# Altium PCB ProbeAmp.PcbDoc (part 1 of 2)
Units mm, origin at the board's own origin, x right, y up, seen from the top; angles counter-clockwise.
Board outline 75 x 25 mm, 6 copper layers (L1, L2, L3, L4, L5, L6), stack 1.04 mm thick; 123 components, 72 nets, 387 pads, 161 vias.
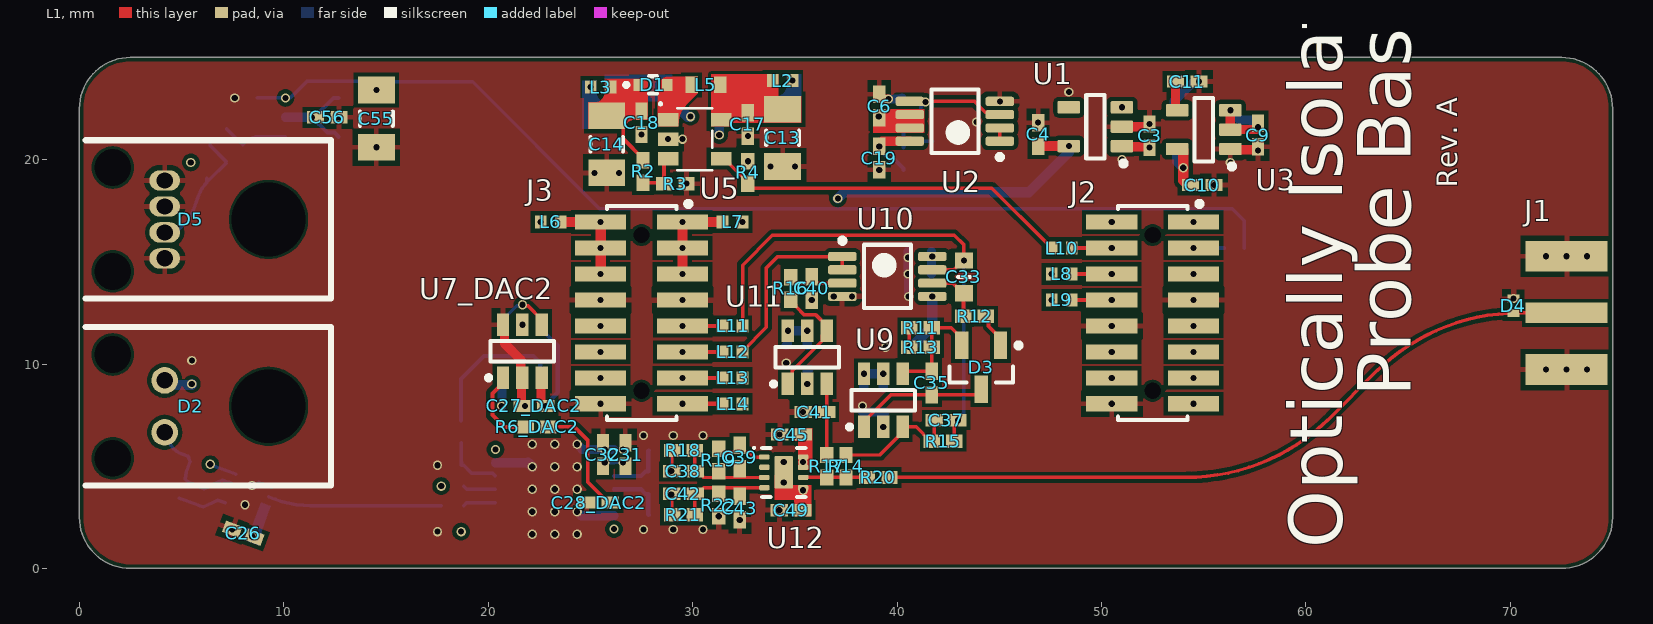
[diagram p0: L1 view]
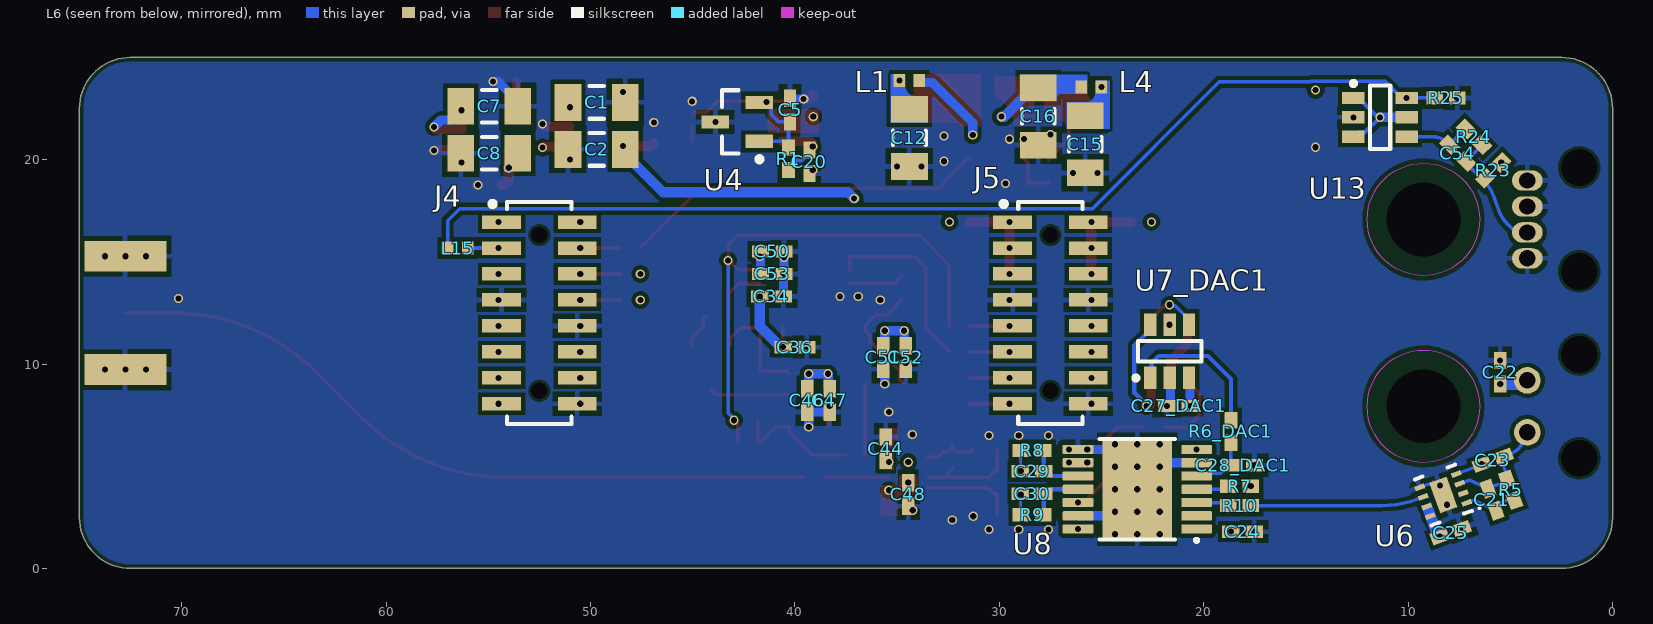
[diagram p1: L6 view, seen from below]
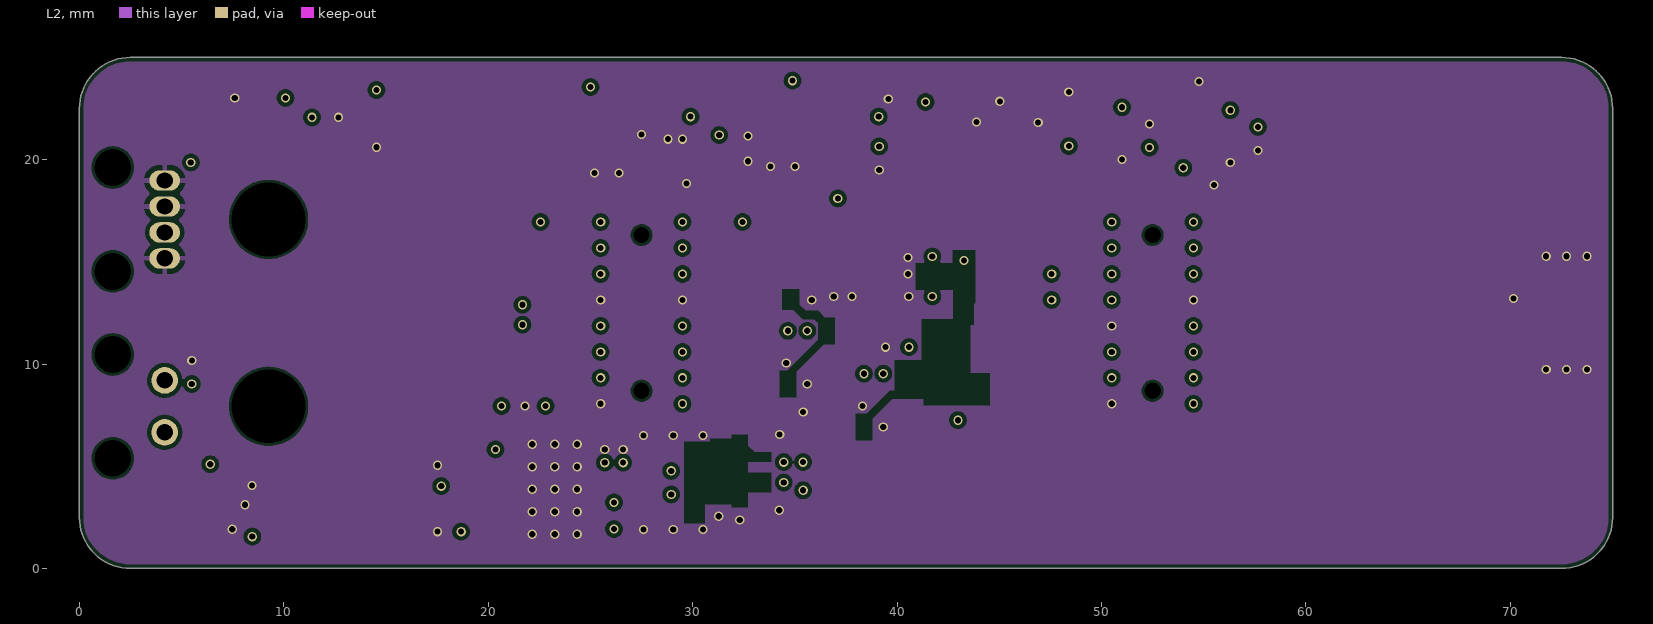
[diagram p2: L2]
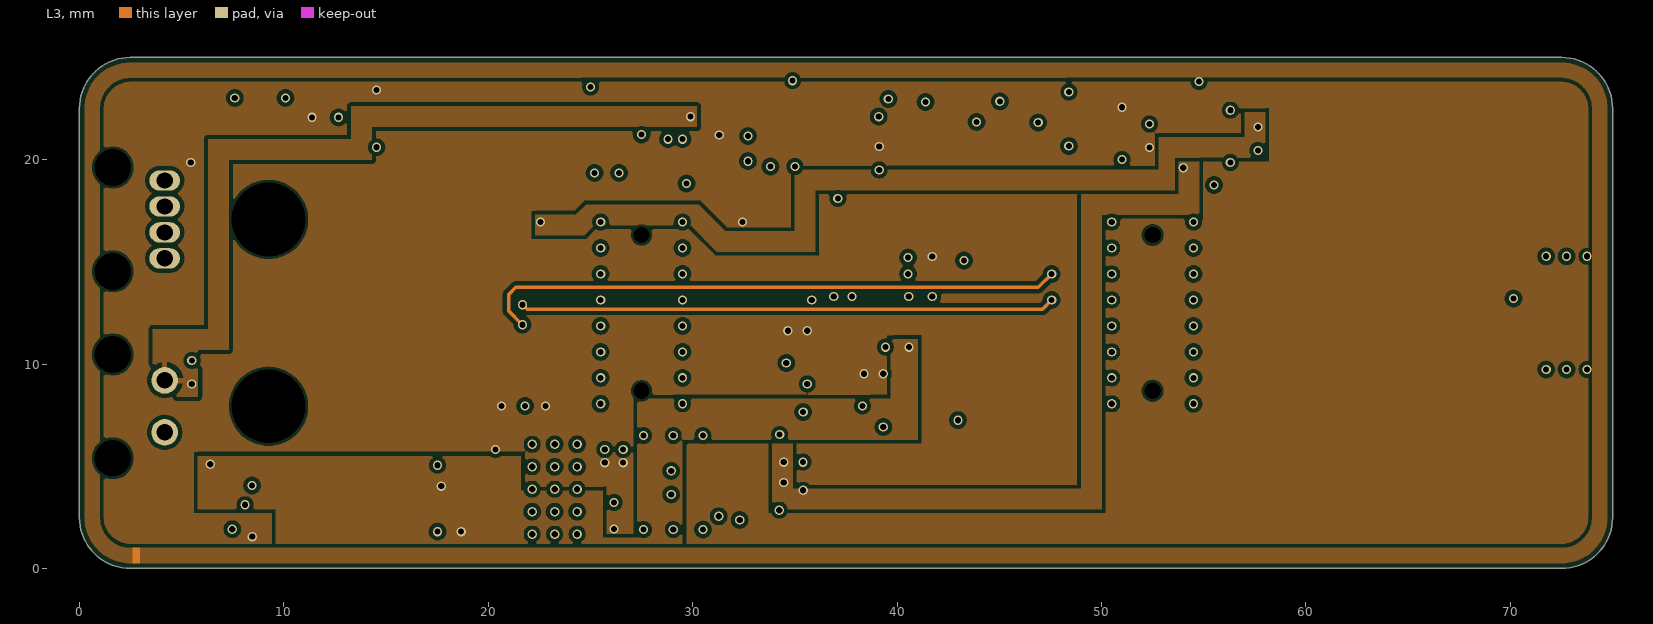
[diagram p3: L3]
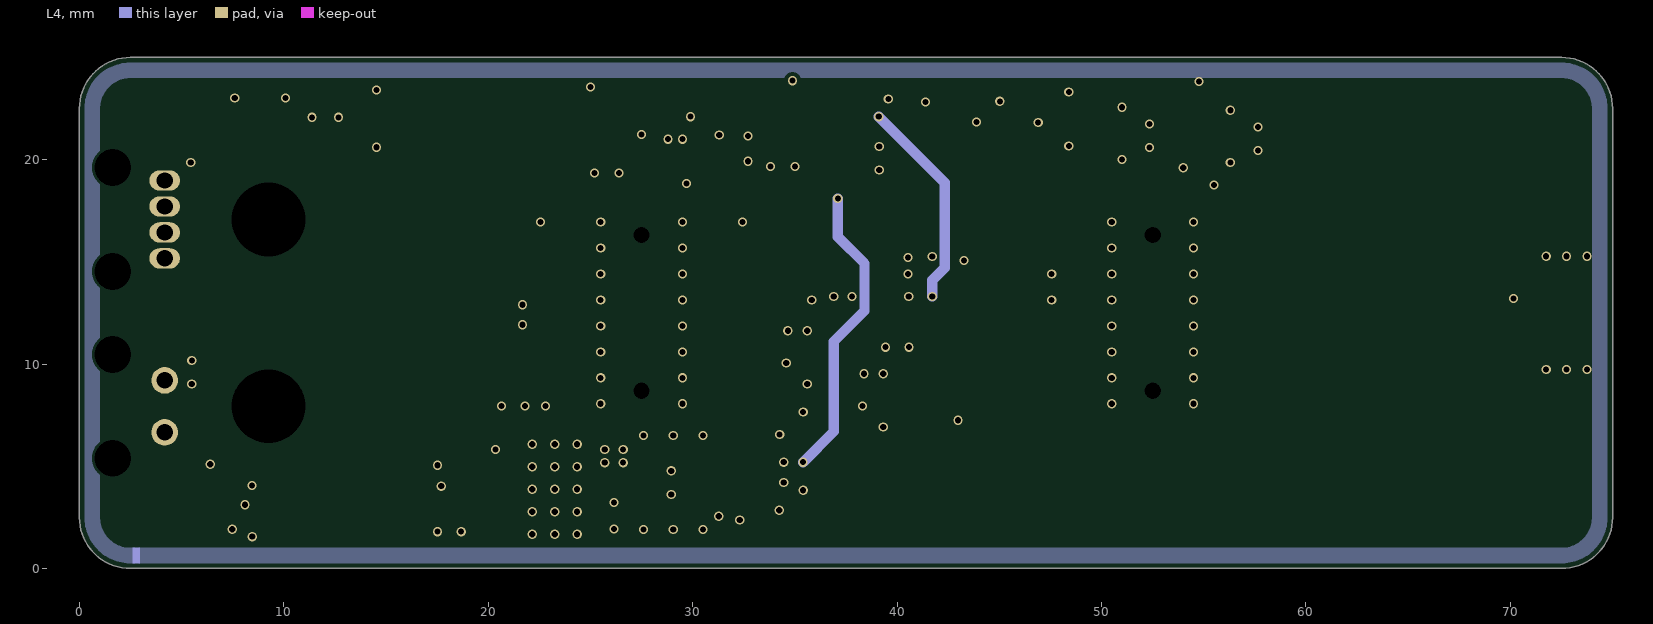
[diagram p4: L4]
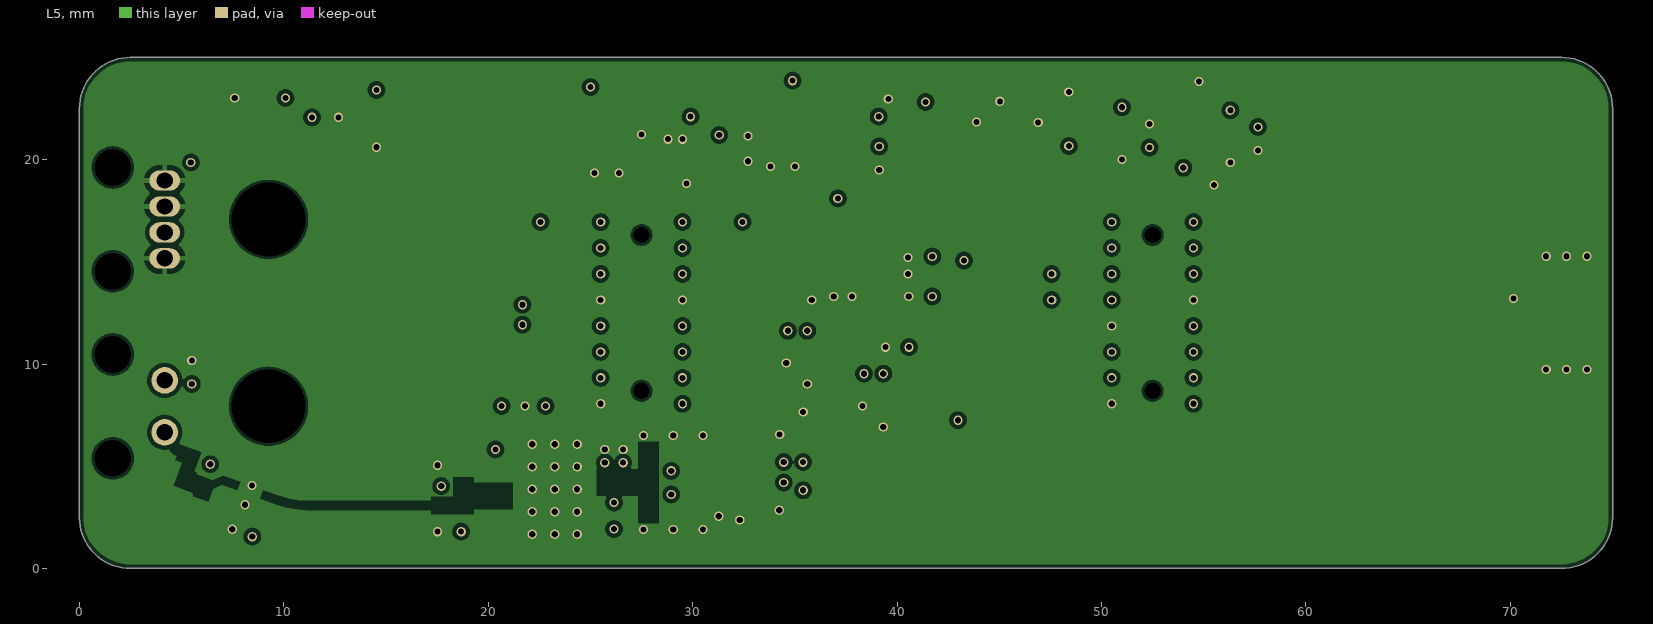
[diagram p5: L5]

## Layer stack, top to bottom
Top Solder: solder mask 0.0102, Solder Resist, Dk 3.5
L1: signal copper 0.035
Dielectric 2: prepreg 0.0994, PP-006, Dk 4.1
L2: signal copper 0.0152
Dielectric 4: core 0.25, PP-006, Dk 4.1
L3: signal copper 0.0152
Dielectric 1: prepreg 0.2104, FR-4, Dk 4.8
L4: signal copper 0.0152
Dielectric 5: core 0.25, PP-006, Dk 4.1
L5: signal copper 0.0152
Dielectric 3: prepreg 0.0994, PP-006, Dk 4.1
L6: signal copper 0.035
Bottom Solder: solder mask 0.0102, Solder Resist, Dk 3.5

## Board outline
0,2.5 ccw(c2.5,2.5) 2.5,0 72.5,0 ccw(c72.5,2.5) 75,2.5 75,22.5 ccw(c72.5,22.5) 72.5,25 2.5,25 ccw(c2.5,22.5) 0,22.5

## Design rules (kind name [scope] priority, off if disabled: settings)
BoardOutlineClearance BoardOutlineClearance_Exceptions [HasFootprint('GCT_USB4110-GF-A') Or HasFootprint('INDUSTRIALFIBEROPTICS_IF-E99B')] p1: gap=0 ignorepadtopadclearanceinfootprint=FALSE
BoardOutlineClearance [All] p2: gap=0.2 ignorepadtopadclearanceinfootprint=FALSE
Clearance Clearance_MOLEX_2171800001 [HasFootprint('MOLEX_2171800001') vs HasFootprint('MOLEX_2171800001')] p1: gap=0.13 ignorepadtopadclearanceinfootprint=FALSE except(0.07: Arc-Hole Track-Hole SMDPad-Hole THPad-Hole Via-Hole Fill-Hole Poly-Hole Region-Hole Text-Hole; 0.2: Arc-Fill Arc-Poly Track-Fill Track-Poly SMDPad-Fill SMDPad-Poly THPad-Fill THPad-Poly Via-Fill Via-Poly Fill-Fill Fill-Poly Poly-Poly)
Clearance [All] p2: gap=0.13 ignorepadtopadclearanceinfootprint=FALSE except(0.2: Arc-Fill Arc-Poly Track-Fill Track-Poly SMDPad-Fill SMDPad-Poly THPad-Fill THPad-Poly Via-Fill Via-Poly Fill-Fill Fill-Poly Poly-Poly)
ComponentClearance [All] p1: gap=0 collisioncheckmode=3 verticalgap=0.254 showdistances=FALSE
DiffPairsRouting DiffPairsRouting_D100 [InDifferentialPairClass('D100')] p1: maxlimit=0.254 minlimit=0.127 mostfreqgap=0.254 toplayer_maxgap=0.127 toplayer_prefgap=0.127 toplayer_minwidth=0.115 toplayer_maxwidth=0.115 toplayer_prefwidth=0.115 bottomlayer_maxgap=0.127 bottomlayer_prefgap=0.127 bottomlayer_minwidth=0.115 bottomlayer_maxwidth=0.115 bottomlayer_prefwidth=0.115 impedanceprofiledriven=TRUE impedanceprofileid={8845BCCA-81C3-408D-A366-10A4A17C61EE} impedanceprofilevalue=100.000000 maxuncoupledlength=12.7
DiffPairsRouting [All] p2: maxlimit=0.254 minlimit=0.254 mostfreqgap=0.254 toplayer_minwidth=0.381 toplayer_maxwidth=0.381 toplayer_prefwidth=0.381 midlayer1_minwidth=0.381 midlayer1_maxwidth=0.381 midlayer1_prefwidth=0.381 midlayer2_minwidth=0.381 midlayer2_maxwidth=0.381 midlayer2_prefwidth=0.381 midlayer3_minwidth=0.381 midlayer3_maxwidth=0.381 midlayer3_prefwidth=0.381 midlayer4_minwidth=0.381 midlayer4_maxwidth=0.381 midlayer4_prefwidth=0.381 bottomlayer_minwidth=0.381 bottomlayer_maxwidth=0.381 bottomlayer_prefwidth=0.381 maxuncoupledlength=12.7
HoleSize [All] p1: absolutevalues=TRUE maxlimit=6 minlimit=0.3 maxpercent=80.000 minpercent=20.000
MinimumAnnularRing [All] p1: minimumring=0.075
MinimumSolderMaskSliver [All] p1: minsoldermaskwidth=0.1
PolygonConnect [All] p1: thpad.connectstyle=Relief thpad.reliefconductorwidth=0.254 thpad.reliefentries=4 thpad.polygonreliefangle="90 Angle" thpad.airgapwidth=0.254 smdpad.connectstyle=Relief smdpad.reliefconductorwidth=0.254 smdpad.reliefentries=4 smdpad.polygonreliefangle="90 Angle" smdpad.airgapwidth=0.254 via.connectstyle=Direct via.reliefconductorwidth=0.254 via.reliefentries=4 via.polygonreliefangle="90 Angle" via.airgapwidth=0.254
RoutingVias [All] p1: holewidth=0.3 width=0.45 viastyle="Through Hole" minholewidth=0.3 minwidth=0.45 maxholewidth=0.5 maxwidth=1
SilkToSilkClearance [All] p1: silktosilkclearance=0
SilkToSolderMaskClearance [IsPad] p1: minsilkscreentomaskgap=0.001 clearancetoexposedcopper=TRUE
SolderMaskExpansion SolderMaskExpansion_Via [IsVia] p1: expansion=0.102 istentingtop=TRUE
SolderMaskExpansion [All] p2: expansion=0.05 istentingtop=FALSE
SupplyNets "Schematic Supply Nets_1" [InNet('+3V3.CMN')] p1: voltage=0.000
SupplyNets "Schematic Supply Nets_10" [InNet('COM')] p2: voltage=0.000
SupplyNets "Schematic Supply Nets_8" [InNet('+5V0')] p3: voltage=0.000
SupplyNets "Schematic Supply Nets_7" [InNet('+5V0AMP')] p4: voltage=0.000
SupplyNets "Schematic Supply Nets_2" [InNet('-5V0AMP')] p5: voltage=0.000
SupplyNets "Schematic Supply Nets" [InNet('-5V0')] p6: voltage=0.000
SupplyNets "Schematic Supply Nets_6" [InNet('+VBIAS')] p7: voltage=0.000
SupplyNets "Schematic Supply Nets_5" [InNet('-2V5')] p8: voltage=0.000
SupplyNets "Schematic Supply Nets_4" [InNet('+2V5')] p9: voltage=0.000
SupplyNets "Schematic Supply Nets_3" [InNet('+2V50REF')] p10: voltage=0.000
UnRoutedNet [All] p1: checkbadconnections=TRUE
Width Width_S50 [InNetClass('S50')] p1: maxlimit=2 minlimit=0.171 preferedwidth=0.188 toplayer_maxwidth=0.171 toplayer_prefwidth=0.171 midlayer3_minwidth=0.188 midlayer3_maxwidth=0.188 midlayer4_minwidth=0.188 midlayer4_maxwidth=0.188 bottomlayer_maxwidth=0.171 bottomlayer_prefwidth=0.171 impedanceprofiledriven=TRUE impedanceprofileid={737AFE0D-4EF8-4D64-97B0-EF90F29A7AE6} impedanceprofilevalue=50.000000 minimp=50.000000 maximp=50.000000 favimp=50.000000
Width [All] p2: maxlimit=2 minlimit=0.17 preferedwidth=0.2
23 further rules are at their usual default settings.

## Classes and differential pairs
differential pair class D100: IN
net class S50: Envelope FIBER.Tx GAIN IN NetC21_1 NetC21_2 NetC54_2 NetR14_2 NetR16_2 Offset OFS PROBE_OUT
component class U_Connectors: J2 J3 J4 J5 L6 L7 L8 L9 L10 L11 L12 L13 L14 L15
channel class DAC: DAC1 DAC2
component class GS: C29 C30 C31 C32 R7 R8 R9 R10 U8
component class DAC2: C27_DAC2 C28_DAC2 C30_DAC2 C31_DAC2 R6_DAC2 U7_DAC2 U8_DAC2
component class DAC1: C27_DAC1 C28_DAC1 C30_DAC1 C31_DAC1 R6_DAC1 U7_DAC1 U8_DAC1
component class AMP: C21 C22 C23 C24 C25 C26 D2 R5 U6
component class PWR: C1 C2 C3 C4 C5 C6 C7 C8 C9 C10 C11 C12 C13 C14 C15 C16 C17 C18 C19 C20 D1 L1 L2 L3 L4 L5 R1 R2 R3 R4 U1 U2 U3 U4 U5
component class OA: C33 C34 C35 C36 C37 C38 C39 C40 C41 C42 C43 C44 C45 C46 C47 C48 C49 C50 C51 C52 C53 D3 D4 J1 R11 R12 R13 R14 R15 R16 R17 R18 R19 R20 R21 R22 U9 U10 U11 U12
component class EOC: C54 C55 C56 D5 R23 R24 R25 U13
differential pair IN: +IN_P -IN_N

## Components (designator, comment, footprint, x,y, rotation, side; value= is the part's Value field where it differs from the comment)
C1 "10u,20%,50V,X5R,1206" CAPC3216X16N 49.7,22.8 r0 bottom value=10u
C2 "10u,20%,50V,X5R,1206" CAPC3216X16N 49.7,20.5 r180 bottom value=10u
C3 "100nF,10%,50V,X7R,0402" CAPC1005X06N 52.35,21.165 r270 top value=100n
C4 "100nF,10%,50V,X7R,0402" CAPC1005X06N 46.9,21.234 r270 top value=100n
C5 "Omit,0402" CAPC1005X06N 40.238,22.433 r270 bottom value=Omit
C6 "1uF,10%,35V,X7R,0402" CAPC1005X06N 39.125,22.621 r270 top value=1u
C7 "10u,20%,50V,X5R,1206" CAPC3216X16N 54.95,22.609 r0 bottom value=10u
C8 "10u,20%,50V,X5R,1206" CAPC3216X16N 54.95,20.309 r180 bottom value=10u
C9 "100nF,10%,50V,X7R,0402" CAPC1005X06N 57.65,21.199 r90 top value=100n
C10 "100nF,10%,50V,X7R,0402" CAPC1005X06N 54.924,18.757 r180 top value=100n
C11 "10nF,10%,25V,X7R,0402" CAPC1005X06N 54.192,23.816 r180 top value=10n
C12 "10u,20%,50V,X5R,1206" CAPC3216X16N 34.4,21.061 r90 bottom value=10u
C13 "10u,20%,50V,X5R,1206" CAPC3216X16N 34.4,21.061 r90 top value=10u
C14 "10u,20%,50V,X5R,1206" CAPC3216X16N 25.8,20.749 r90 top value=10u
C15 "10u,20%,50V,X5R,1206" CAPC3216X16N 25.8,20.749 r90 bottom value=10u
C16 "10u,20%,50V,X5R,1206" CAPC3216X16N 28.1,22.111 r90 bottom value=10u
C17 "1uF,10%,35V,X7R,0402" CAPC1005X06N 32.7,21.722 r90 top value=1u
C18 "1uF,10%,35V,X7R,0402" CAPC1005X06N 27.5,21.8 r90 top value=1u
C19 "1uF,10%,35V,X7R,0402" CAPC1005X06N 39.125,20.072 r90 top value=1u
C20 "100nF,10%,50V,X7R,0402" CAPC1005X06N 39.288,19.897 r270 bottom value=100n
C21 "Omit,0402" CAPC1005X06N 5.902,3.36 r250 bottom value=Omit
C22 "100nF,10%,50V,X7R,0402" CAPC1005X06N 5.5,9.6 r90 bottom value=100n
C23 "Omit,0402" CAPC1005X06N 5.861,5.294 r160 bottom value=Omit
C24 "100nF,10%,50V,X7R,0402" CAPC1005X06N 18.1,1.8 r180 bottom value=100n
C25 "100nF,10%,50V,X7R,0402" CAPC1005X06N 7.918,1.752 r160 bottom value=100n
C26 "1uF,10%,35V,X7R,0402" CAPC1005X06N 8.018,1.724 r340 top value=1u
C27_DAC1 "100nF,10%,50V,X7R,0402" CAPC1005X06N 21.229,7.947 r0 bottom value=100n (schematic designator C27)
C27_DAC2 "100nF,10%,50V,X7R,0402" CAPC1005X06N 22.229,7.947 r180 top value=100n (schematic designator C27)
C28_DAC1 "100nF,10%,25V,X7R,0402" CAPC1005X06N 18.094,5.05 r0 bottom value=100nF (schematic designator C28)
C28_DAC2 "100nF,10%,25V,X7R,0402" CAPC1005X06N 25.4,3.225 r0 top value=100nF (schematic designator C28)
C29 "Omit,0402" CAPC1005X06N 28.4,4.75 r0 bottom value=Omit
C30 "Omit,0402" CAPC1005X06N 28.4,3.65 r0 bottom value=Omit
C31 "1uF,10%,35V,X7R,0402" CAPC1005X06N 26.709,5.57 r270 top value=1u
C32 "100nF,10%,50V,X7R,0402" CAPC1005X06N 25.609,5.57 r90 top value=100n
C33 "10nF,1%,25V,C0G,0603" CAPC_0603 43.272,14.264 r90 top value=10n
C34 "100nF,10%,50V,X7R,0402" CAPC1005X06N 41.147,13.308 r180 bottom value=100n
C35 "100pF,50V,C0G,0402" CAPC1005X06N 41.7,9.075 r270 top value=100p
C36 "100nF,10%,50V,X7R,0402" CAPC1005X06N 40,10.825 r180 bottom value=100n
C37 "10pF,50V,C0G,0402" CAPC1005X06N 42.4,7.252 r0 top value=10p
C38 "Omit,0402" CAPC1005X06N 29.55,4.75 r180 top value=Omit
C39 "Omit,0402" CAPC1005X06N 32.3,5.45 r270 top value=Omit
C40 "100nF,10%,50V,X7R,0402" CAPC1005X06N 35.822,13.7 r270 top value=100n
C41 "Omit,0402" CAPC1005X06N 35.98,7.65 r0 top value=Omit
C42 "Omit,0402" CAPC1005X06N 29.55,3.65 r180 top value=Omit
C43 "Omit,0402" CAPC1005X06N 32.3,2.95 r90 top value=Omit
C44 "1uF,10%,35V,X7R,0402" CAPC1005X06N 35.555,5.853 r270 bottom value=1u
C45 "100nF,10%,50V,X7R,0402" CAPC1005X06N 34.83,6.55 r180 top value=100n
C46 "100nF,10%,50V,X7R,0402" CAPC1005X06N 39.4,8.225 r270 bottom value=100n
C47 "1uF,10%,35V,X7R,0402" CAPC1005X06N 38.3,8.225 r90 bottom value=1u
C48 "1uF,10%,35V,X7R,0402" CAPC1005X06N 34.455,3.625 r90 bottom value=1u
C49 "100nF,10%,50V,X7R,0402" CAPC1005X06N 34.81,2.85 r180 top value=100n
C50 "1uF,10%,35V,X7R,0402" CAPC1005X06N 41.11,15.508 r0 bottom value=1u
C51 "100nF,10%,50V,X7R,0402" CAPC1005X06N 35.68,10.325 r270 bottom value=100n
C52 "1uF,10%,35V,X7R,0402" CAPC1005X06N 34.58,10.325 r90 bottom value=1u
C53 "100nF,10%,50V,X7R,0402" CAPC1005X06N 41.11,14.408 r180 bottom value=100n
C54 "18p,C0G,50V,0402" CAPC1005X06N 7.579,20.316 r225 bottom value=18p
C55 "10u,20%,50V,X5R,1206" CAPC3216X16N 14.527,22.004 r90 top value=10u
C56 "100nF,10%,50V,X7R,0402" CAPC1005X06N 12.127,22.067 r0 top value=100n
D1 "PMEG6002EB-QX" NEXPERIA_PKG_SOD523 28.054,23.654 r0 top
D2 "IF D91B" INDUSTRIALFIBEROPTICS_IF-D91B 4.173,7.928 r90 top locked
D3 "BAT54SLT1G" SOT95P240X120-3N 44.11,9.838 r270 top
D4 "ESDSLC5V0LB-TP" MICROCOMMERCIAL_DFN1006-2_NPOL 70.15,12.85 r90 top
D5 "IF-E99B" INDUSTRIALFIBEROPTICS_IF-E99B 4.173,17.072 r90 top locked
J1 "CON-SMA-EDGE-S" RFSOLUTIONS_CON-SMA-EDGE-S 73.25,12.5 r270 top
J2 "HX PZ1.27-2x8P TP" "HANXIA_HX PZ1.27-2x8P TP" 52.5,12.5 r0 top locked
J3 "HX PZ1.27-2x8P TP" "HANXIA_HX PZ1.27-2x8P TP" 27.5,12.5 r0 top locked
J4 "PM127-2-08-S-4.3" HCTL_PM127-2-08-S-4.3 52.5,12.5 r180 bottom locked
J5 "PM127-2-08-S-4.3" HCTL_PM127-2-08-S-4.3 27.5,12.5 r180 bottom locked
L1 "470R,0402" INDC1005X05N 34.4,23.861 r0 bottom value=470
L2 "470R,0402" INDC1005X05N 34.4,23.861 r180 top value=470
L3 "470R,0402" INDC1005X05N 25.497,23.549 r180 top value=470
L4 "470R,0402" INDC1005X05N 25.497,23.549 r0 bottom value=470
L5 "10uH,20%,250mA,0603" INDC1608X08N 30.65,23.654 r180 top value=10u
L6 "470R" INDC1005X05N 23.05,16.95 r0 top
L7 "470R" INDC1005X05N 31.95,16.95 r180 top
L8 "470R" INDC1005X05N 48.05,14.405 r0 top
L9 "470R" INDC1005X05N 48.05,13.135 r0 top
L10 "470R" INDC1005X05N 48.05,15.675 r0 top
L11 "470R" INDC1005X05N 31.95,11.865 r180 top
L12 "470R" INDC1005X05N 31.95,10.595 r180 top
L13 "470R" INDC1005X05N 31.95,9.325 r180 top
L14 "470R" INDC1005X05N 31.95,8.055 r180 top
L15 "470R" INDC1005X05N 56.5,15.675 r180 bottom
R1 "1k,5%,0.063W,0402" RESC1005X04N 40.313,20.042 r270 bottom value=1k
R2 "22k1,1%,0.063W,0402" RESC1005X04N 27.575,19.42 r90 top value=22.1k
R3 "953R,1%,0.063W,0402" RESC1005X04N 29.15,18.825 r180 top value=953
R4 "10k,5%,0.063W,0402" RESC1005X04N 32.7,19.372 r270 top value=10k
R5 "499R,0.1%,0.063W,0402" RESC1005X04N 4.991,3.852 r250 bottom value=499
R6_DAC1 "10R,1%,0.063W,0402" RESC1005X04N 18.669,6.7 r270 bottom value=10 (schematic designator R6)
R6_DAC2 "10R,1%,0.063W,0402" RESC1005X04N 22.392,6.922 r0 top value=10 (schematic designator R6)
R7 "0R0,0402" RESC1005X04N 18.25,4.025 r0 bottom value=0R
R8 "24R9,1%,0.063W,0402" RESC1005X04N 28.4,5.775 r0 bottom value=24.9
R9 "24R9,1%,0.063W,0402" RESC1005X04N 28.4,2.625 r0 bottom value=24.9
R10 "0R0,0402" RESC1005X04N 18.25,3.075 r0 bottom value=0R
R11 "100k,0.1%,0.063W,0402" RESC1005X04N 41.15,11.775 r180 top value=100k
R12 "10k,0.1%,0.063W,0402" RESC1005X04N 43.793,12.338 r180 top value=10k
R13 "100k,0.1%,0.063W,0402" RESC1005X04N 41.15,10.825 r180 top value=100k
R14 "100k,0.1%,0.063W,0402" RESC1005X04N 37.505,5 r270 top value=100k
R15 "100k,0.1%,0.063W,0402" RESC1005X04N 42.25,6.227 r180 top value=100k
R16 "100k,0.1%,0.063W,0402" RESC1005X04N 34.797,13.7 r270 top value=100k
R17 "0R0,0402" RESC1005X04N 36.555,5 r90 top value=0R
R18 "1k,0.1%,0.063W,0402" RESC1005X04N 29.55,5.775 r0 top value=1k
R19 "1k,0.1%,0.063W,0402" RESC1005X04N 31.275,5.3 r90 top value=1k
R20 "39R" RESC1005X04N 39.08,4.45 r0 top
R21 "1k,0.1%,0.063W,0402" RESC1005X04N 29.55,2.625 r0 top value=1k
R22 "1k,0.1%,0.063W,0402" RESC1005X04N 31.275,3.102 r270 top value=1k
R23 "750R,1%,0402" RESC1005X04N 5.84,19.475 r135 bottom value=750
R24 "100R,1%,0402" RESC1005X04N 6.784,21.112 r225 bottom value=100
R25 "100k,0.1%,0.063W,0402" RESC1005X04N 8.152,23.017 r180 bottom value=100k
U1 "TPS70925DBVR" TEXASINSTRUMENTS_PKG_DBV0005A 49.7,21.609 r180 top
U2 "LM7332MMX/NOPB" TEXASINSTRUMENTS_PKG_DGK0008A 42.825,21.875 r180 top
U3 "TPS72325DBVR" TEXASINSTRUMENTS_PKG_DBV0005A 55,21.466 r180 top
U4 "TL431BIDBZR" SOT95P240X120-3N 42.813,21.842 r0 bottom
U5 "MIC2288YD5-TR" MICROCHIP_PKG_TSOT-5LD-PL-1 30.1,21 r0 top
U6 "OPA858YR" TEXASINSTRUMENTS_PKG_DSG0008A 8.279,3.589 r340 bottom
U7_DAC1 "MCP4725A0T-E/CH" SOTFL95P260X145-6 21.669,10.622 r90 bottom (schematic designator U7)
U7_DAC2 "MCP4725A0T-E/CH" SOTFL95P260X145-6 21.669,10.625 r90 top (schematic designator U7)
U8 "THS7530PWP" TEXASINSTRUMENTS_PKG_PWP0014J 23.25,3.875 r0 bottom
U9 "OPA836IDBVR" TEXASINSTRUMENTS_PKG_DBV0006A 39.325,8.225 r90 top
U10 "LMV342IDGKR" TEXASINSTRUMENTS_PKG_DGK0008A 39.522,14.283 r0 top
U11 "OPA836IDBVR" TEXASINSTRUMENTS_PKG_DBV0006A 35.605,10.325 r90 top
U12 "OPA856IDSGR" TEXASINSTRUMENTS_PKG_DSG0008A 34.455,4.7 r0 top
U13 "SN74LVC1G57DBVR" TEXASINSTRUMENTS_PKG_DBV0006A 11.377,22.067 r180 bottom

## Footprints (in the part's own frame and the unit in brackets; to place one, negate y for a bottom-side part, rotate by r counter-clockwise, add the part's x,y. Pads: shape width x height; smd on the part's side, far side on the other; paste and mask are expansions set on the pad)
CAPC1005X06N [mm]
  rect 0.85x0.6 smd: 1(-0.575,0) 2(0.575,0)
  body extent -0.53,-0.28 0.53,0.27, height 0.55
CAPC3216X16N [mm] "Chip Capacitor, 2-Leads, Body 3.20x1.60mm, IPC Medium Density"
  rect 1.3x1.8 smd: 1(-1.4,0) 2(1.4,0)
  silkscreen extent -0.35,-0.8 0.35,0.8, body extent -1.75,-0.95 1.75,0.95, height 1.6
CAPC_0603 [mm] "CAPC_0603"
  rect 0.8x0.9 smd: 1(-0.8,0) 2(0.8,0)
  silkscreen extent 0,-0.3 0,0.3, body extent -0.8,-0.4 0.8,0.4, height 0.5
"HANXIA_HX PZ1.27-2x8P TP" [mm]
  rect 2.5x0.74 smd: 1(2,4.445) 2(-2,4.445) 3(2,3.175) 4(-2,3.175) 5(2,1.905) 6(-2,1.905) 7(2,0.635) 8(-2,0.635) 9(2,-0.635) 10(-2,-0.635) 11(2,-1.905) 12(-2,-1.905) 13(2,-3.175) 14(-2,-3.175) 15(2,-4.445) 16(-2,-4.445)
  silkscreen extent -1.7,-5.23 2.41,5.46, body extent -2.75,-5.09 2.75,5.07, height 4.69
HCTL_PM127-2-08-S-4.3 [mm]
  rect 1.9x0.66 smd: 1(-1.85,4.445) 2(1.85,4.445) 3(-1.85,3.175) 4(1.85,3.175) 5(-1.85,1.905) 6(1.85,1.905) 7(-1.85,0.635) 8(1.85,0.635) 9(-1.85,-0.635) 10(1.85,-0.635) 11(-1.85,-1.905) 12(1.85,-1.905) 13(-1.85,-3.175) 14(1.85,-3.175) 15(-1.85,-4.445) 16(1.85,-4.445)
  round 0 hole 0.8 unplated: ""(0,-3.81) ""(0,3.81)
  silkscreen extent -2.41,-5.43 1.57,5.46, body extent -2.25,-5.26 2.25,5.26, height 3.61
INDC1005X05N [mm] "Chip Inductor, 2-Leads, Body 1.00x0.50mm, IPC Medium Density"
  rect 0.57x0.64 smd: 1(-0.49,0) 2(0.49,0)
  body extent -0.5,-0.25 0.5,0.25, height 0.5
INDC1608X08N [mm] "Chip Inductor, 2-Leads, Body 1.60x0.80mm, IPC Medium Density"
  rect 0.6x0.8 smd: 1(-0.7,0) 2(0.7,0)
  body extent -0.8,-0.4 0.8,0.4, height 0.8
INDUSTRIALFIBEROPTICS_IF-D91B [mm]
  round 1.3 hole 0.8 mask+0: 1(-1.27,0) 2(1.27,0)
  round 0 hole 1.8 unplated mask+0: ""(-2.54,2.54) ""(2.54,2.54)
  round 0 hole 3.6 unplated mask+0: ""(0,-5.08)
  silkscreen extent -3.87,-8.14 3.87,3.86, body extent -4.31,-8.31 4.31,19.44, height 11.3
INDUSTRIALFIBEROPTICS_IF-E99B [mm]
  oval 1x1.5 hole 0.8 mask+0: 1(1.905,0) 2(0.635,0) 3(-0.635,0) 4(-1.905,0)
  round 0 hole 1.8 unplated mask+0: ""(-2.54,2.54) ""(2.54,2.54)
  round 0 hole 3.6 unplated mask+0: ""(0,-5.08)
  silkscreen extent -3.87,-8.14 3.87,3.86, body extent -4.32,-8.31 4.32,19.44, height 11.3
MICROCHIP_PKG_TSOT-5LD-PL-1 [mm]
  rect 1x0.66 smd: 1(-1.3,0.95) 2(-1.3,0) 3(-1.3,-0.95) 4(1.3,-0.95) 5(1.3,0.95)
  silkscreen extent -1.74,-1.51 0.86,1.79, body extent -1.4,-1.45 1.4,1.45, height 0.9
MICROCOMMERCIAL_DFN1006-2_NPOL [mm] "MICROCOMMERCIAL_DFN1006-2_NPOL"
  rect 0.4x0.6 smd: 1(-0.35,0) 2(0.35,0)
  body extent -0.5,-0.3 0.5,0.3, height 0.55
NEXPERIA_PKG_SOD523 [mm]
  rect 0.5x0.6 smd: 1(-0.7,0) 2(0.7,0)
  silkscreen extent -1.4,-0.43 0.2,0.43, body extent -0.63,-0.43 0.63,0.43, height 0.65
RESC1005X04N [mm] "Chip Resistor, 2-Leads, Body 1.0x0.5mm, IPC Medium Density"
  rect 0.8x0.65 smd: 1(-0.55,0) 2(0.55,0)
  body extent -0.52,-0.27 0.53,0.28, height 0.4
RFSOLUTIONS_CON-SMA-EDGE-S [mm]
  rect 1x4 smd: 1(0,-0.5)
  rect 1.5x4 smd: 2(-2.77,-0.5) 2(2.77,-0.5)
  rect 1.5x4 smd far side: 2(-2.77,-0.5) 2(2.77,-0.5)
  body extent -3.18,-2.06 3.18,11.27, height 3.55
SOT95P240X120-3N [mm] "SOT23, 3-Leads, Body 3.1x2.7mm (max), Pitch 0.95mm, IPC Medium Density"
  rect 1.35x0.65 smd: 1(-1.075,0.95) 2(-1.075,-0.95) 3(1.075,0)
  silkscreen extent -1.2,-1.55 0.75,1.95, body extent -0.75,-1.56 0.75,1.56, height 1.2
SOTFL95P260X145-6 [mm] "SOT23, 6-Leads, Body 2.90x2.80mm, Pitch 0.95mm"
  rect 1.1x0.6 smd: 1(-1.3,0.95) 2(-1.3,0) 3(-1.3,-0.95) 4(1.3,-0.95) 5(1.3,0) 6(1.3,0.95)
  silkscreen extent -1.4,-1.55 0.5,1.75, body extent -1.5,-1.53 1.5,1.53, height 1.1
TEXASINSTRUMENTS_PKG_DBV0005A [mm] "SOT23, 5-Leads, Body 2.90x2.80mm, Pitch 0.95mm"
  rrect17% 1.1x0.6 smd mask+0.07: 1(-1.3,0.95) 2(-1.3,0) 3(-1.3,-0.95) 4(1.3,-0.95) 5(1.3,0.95)
  silkscreen extent -1.5,-1.55 0.45,1.92, body extent -1.4,-1.45 1.4,1.45, height 1.2
TEXASINSTRUMENTS_PKG_DBV0006A [mm] "SOT23, 6-Leads, Body 2.90x2.80mm, Pitch 0.95mm"
  rect 1.1x0.6 smd: 1(-1.3,0.95) 2(-1.3,0) 3(-1.3,-0.95) 4(1.3,-0.95) 5(1.3,0) 6(1.3,0.95)
  silkscreen extent -1.4,-1.55 0.5,1.75, body extent -1.5,-1.53 1.5,1.53, height 1.1
TEXASINSTRUMENTS_PKG_DGK0008A [mm]
  rrect50% 1.4x0.45 smd: 1(-2.2,0.975) 2(-2.2,0.325) 3(-2.2,-0.325) 4(-2.2,-0.975) 5(2.2,-0.975) 6(2.2,-0.325) 7(2.2,0.325) 8(2.2,0.975)
  silkscreen extent -2.33,-1.55 1.15,1.87, body extent -2.45,-1.55 2.45,1.55, height 1.1
TEXASINSTRUMENTS_PKG_DSG0008A [mm]
  rrect40% 0.5x0.25 smd paste+0 mask+0.07: 1(-0.95,0.75) 2(-0.95,0.25) 3(-0.95,-0.25) 4(-0.95,-0.75) 5(0.95,-0.75) 6(0.95,-0.25) 7(0.95,0.25) 8(0.95,0.75)
  rrect11% 0.9x1.6 smd paste-0.9 mask+0.07: 9(0,0)
  silkscreen extent -1.5,-1.2 1.05,1.25, body extent -1.05,-1.05 1.05,1.05, height 0.8
TEXASINSTRUMENTS_PKG_PWP0014J [mm] "HTTSOP14, Body 5.00x4.40mm, Pitch 0.65mm, Thermal Pad 3.34x2.94mm, IPC Medium Density"
  rrect22% 1.5x0.45 smd mask+0.05: 1(-2.9,1.95) 2(-2.9,1.3) 3(-2.9,0.65) 4(-2.9,0) 5(-2.9,-0.65) 6(-2.9,-1.3) 7(-2.9,-1.95) 8(2.9,-1.95) 9(2.9,-1.3) 10(2.9,-0.65) 11(2.9,0) 12(2.9,0.65) 13(2.9,1.3) 14(2.9,1.95)
  rect 3.4x5 smd paste-2539.97 mask+0.102: 15(0,0)
  silkscreen extent -2.95,-2.45 1.85,2.55, body extent -3.21,-2.5 3.21,2.5, height 1

## Part data
C1 C2 C7 C8 C12 C13 C14 C15 C16 C55: library part CAP,Cer,10uF,50VDC,X5R,1206, "10ï¿½F ï¿½20% 50V Ceramic Capacitor X5R 1206 (3216 Metric)", Manufacturer 1="Samsung Electro-Mechanics", Manufacturer 1 Part Number=CL31A106MBHNNNE, Vendor 1 Part Number=1276-6736-1-ND, CreatedBy="Judd Foster", HelpURL=https://www.samsungsem.com/resources/file/global/support/product_catalog/MLCC.pdf, Part Name=CAP,Cer,10uF,50VDC,X5R,1206, Vendor 1=Digikey
C3 C4 C9 C10 C20 C22 C24 C25 C27_DAC1 C27_DAC2 C32 C34 C36 C40 C45 C46 C49 C51 C53 C56: library part CAP,Cer,100nF,10%,50V,X7R,0402, "50V 100nF X7R Â±10% 0402 Ceramic Capacitors ROHS", Manufacturer 1=Murata, Manufacturer 1 Part Number=GRM155R71H104KE14D, Vendor 1 Part Number=C77020, CreatedBy="Judd Foster", HelpURL=https://www.lcsc.com/datasheet/C77020.pdf, Part Name=CAP,Cer,100nF,10%,50V,X7R,0402, Vendor 1=LCSC
C5 C21 C23 C29 C30 C38 C39 C41 C42 C43: library part CAP,Omit,0402, "Omit", Manufacturer 1=N/A, CreatedBy="Judd Foster", HelpURL=N/A, Manufacturer 1 Part Number=N/A, Part Name=CAP,Omit,0402, Vendor 1=N/A, Vendor 1 Part Number=N/A
C6 C17 C18 C19 C26 C31 C44 C47 C48 C50 C52: library part CAP,Cer,1uF,35VDC,X5R,0402, "1 ï¿½F ï¿½10% 35V Ceramic Capacitor X5R 0402 (1005 Metric)", Manufacturer 1="TDK Corporation", Manufacturer 1 Part Number=C1005X5R1V105K050BC, Vendor 1 Part Number=445-9073-1-ND, CreatedBy="Judd Foster", HelpURL=https://product.tdk.com/info/en/catalog/datasheets/mlcc_commercial_general_en.pdf?ref_disty=digikey, Part Name=CAP,Cer,1uF,35VDC,X5R,0402, Vendor 1=Digikey
C11: library part CAP,Cer,10nF,10%,25V,X7R,0402, "10000pF ï¿½10% 25V Ceramic Capacitor X7R 0402 (1005 Metric)", Manufacturer 1="Murata Electronics", Manufacturer 1 Part Number=GCM155R71E103KA37D, Vendor 1 Part Number=490-6043-1-ND, CreatedBy="Judd Foster", HelpURL=https://psearch.en.murata.com/capacitor/product/GCM155R71E103KA37%23.pdf, Part Name=CAP,Cer,10nF,10%,25V,X7R,0402, Vendor 1=Digikey
C28_DAC1 C28_DAC2: library part CAP,Cer,100nF,10%,25V,X7R,0402, "0.1ï¿½F ï¿½10% 25V Ceramic Capacitor X7R 0402 (1005 Metric)", Manufacturer 1="Murata Electronics", Manufacturer 1 Part Number=GRM155R71E104KE14J, Vendor 1 Part Number=490-14603-1-ND, CreatedBy="Judd Foster", HelpURL=https://search.murata.co.jp/Ceramy/image/img/A01X/G101/ENG/GRM155R71E104KE14-01.pdf, Part Name=CAP,Cer,100nF,10%,25V,X7R,0402, Vendor 1=DigiKey
C33: library part CAP,CER,10nF,1%,25V,C0G,0603, "CAP,CER,10nF,1%,25V,C0G,0603", Manufacturer 1=Murata, Manufacturer 1 Part Number=GRT1885C1E103FA02D, CreatedBy="Kevin Heyer", HelpURL=https://pim.murata.com/asset/pim4/ceramicCapacitorSMD/GRT1885C1E103FA02-01A-EN_PDF_CERAMICCAPACITORSMD, Part Name=CAP,CER,10nF,1%,25V,C0G,0603
C35: library part CAP,Cer,100pF,50VDC,C0G,0402, "100pF ï¿½5% 50V Ceramic Capacitor C0G, NP0 0402 (1005 Metric)", Manufacturer 1="Murata Electronics", Manufacturer 1 Part Number=GCM1555C1H101JA16D, Vendor 1 Part Number=490-10669-1-ND, CreatedBy="Judd Foster", HelpURL=https://www.murata.com/~/media/webrenewal/support/library/catalog/products/capacitor/mlcc/c03e.ashx?la=en-us, Part Name=CAP,Cer,100pF,50VDC,C0G,0402, Vendor 1=Digikey
C37: library part CAP,Cer,10pF,16VDC,C0G,0402, "10 pF ï¿½10% 16V Ceramic Capacitor C0G, NP0 0402 (1005 Metric)", Manufacturer 1=Yageo, Manufacturer 1 Part Number=CC0402KRNPO7BN100, Vendor 1 Part Number=311-3777-1-ND, CreatedBy="Judd Foster", HelpURL=https://www.yageo.com/upload/media/product/productsearch/datasheet/mlcc/UPY-GP_NP0_16V-to-50V_18.pdf, Part Name=CAP,Cer,10pF,16VDC,C0G,0402, Vendor 1=Digikey
C54: library part 106-00106, "CAP,18p,C0G,50V,0402", Manufacturer1="Murata Manufacturing Company, Ltd.", Manufacturer1PartNumber=GRM1555C1H180JA01D, Changed Date=2026-03-25T20:02:10-07:00, ComponentLink1Description="PLM Part Link", ComponentLink1URL=http://k1plm09.kardium.local/Windchill/app/#ptc1/tcomp/infoPage?ContainerOid=OR:wt.inf.library.WTLibrary:31712871&oid=OR:wt.part.WTPart:123155911&u8=1, CreatedBy="Kevin Riebs (admin)", HelpURL="C:\KVault\Products\Electrical OTS Parts\Datasheets\Murata\GRM1555C1H180JA01D.pdf", Part Number=106-00106, State=Approved
D1: library part DIODE,Schottky,60V,200mA,SOD523, "Diode 60 V 200mA Surface Mount SOD-523", Manufacturer 1="Nexperia USA Inc.", CreatedBy="Judd Foster", HelpURL=https://assets.nexperia.com/documents/data-sheet/PMEG6002EB-Q.pdf, Manufacturer 1 Part Number=PMEG6002EB-QX, Part Name=DIODE,Schottky,60V,200mA,SOD523, Vendor 1=DigiKey, Vendor 1 Part Number=PMEG6002EB-QX
D2: library part "RECEIVER,FIBER OPTIC,450-1050NM,IF-D91B", "Fiber Optic Receiver General Purpose 100Mbps", Manufacturer 1="Industrial Fiber Optics", Vendor 1 Part Number=FB200-ND, CreatedBy="Judd Foster", HelpURL=https://i-fiberoptics.com/pdf/ifd91b-1809.pdf, Manufacturer 1 Part Number="IF D91B", Part Name="RECEIVER,FIBER OPTIC,450-1050NM,IF-D91B", Vendor 1=DigiKey
D3: library part DIODE,Array,Schottky,Series,30V,200mA,SOT23, "Diode Array 1 Pair Series Connection 30 V 200mA (DC) Surface Mount TO-236-3, SC-59, SOT-23-3", Manufacturer 1=onsemi, Vendor 1 Part Number=BAT54SLT1GOSCT-ND, CreatedBy="Judd Foster", HelpURL=https://www.onsemi.com/pdf/datasheet/bat54slt1-d.pdf, Manufacturer 1 Part Number=BAT54SLT1G, Part Name=DIODE,Array,Schottky,Series,30V,200mA,SOT23, Vendor 1=Digikey
D4: library part DIODE,TVS,5.0V,SOD882, "20V Clamp 4A (8/20ï¿½s) Ipp Tvs Diode Surface Mount 2-DFN1006", Manufacturer 1="Micro Commercial Co", Vendor 1 Part Number=ESDSLC5V0LB-TPMSCT-ND, CreatedBy="Judd Foster", HelpURL=https://www.mccsemi.com/pdf/Products/ESDSLC5V0LB(DFN1006-2).pdf, Manufacturer 1 Part Number=ESDSLC5V0LB-TP, Part Name=DIODE,TVS,5.0V,SOD882, Vendor 1=Digikey
D5: library part "XMITTER,FIBER OPTIC,650NM,1.9V,IF-E99B", "Fiber Optic Transmitter 650nm 1.9V 50 mA Connector-less", Manufacturer 1="Industrial Fiber Optics", Vendor 1 Part Number=FB161-ND, CreatedBy="Judd Foster", HelpURL=https://i-fiberoptics.com/pdf/if-e99bdatasheet.pdf, Manufacturer 1 Part Number=IF-E99B, Part Name="XMITTER,FIBER OPTIC,650NM,1.9V,IF-E99B", Vendor 1=DigiKey
J1: library part Conn,RF,SMA,Fem,50R,Edge,SMD, "SMA Connector Jack, Female Socket Board Edge, End Launch Solder", Manufacturer 1="RF Solutions", Vendor 1 Part Number=CON-SMA-EDGE-S-ND, CreatedBy="Judd Foster", HelpURL=https://www.rfsolutions.co.uk/content/download-files/CON-SMA-EDGE-6-DATASHEET.pdf, Manufacturer 1 Part Number=CON-SMA-EDGE-S, Part Name=Conn,RF,SMA,Fem,50R,Edge,SMD, Vendor 1=DigiKey
J2 J3: library part "CONN,Hdr,2x8 Pin,1.27mm,SMD", "CONN HEADER 16POS 1.27mm DUAL ROW SMD", Manufacturer 1=hanxia, Vendor 1 Part Number=C41376040, CreatedBy="Judd Foster", HelpURL=https://www.lcsc.com/datasheet/C41376040.pdf?spm=wm.sxq.inf.ggs___wm.fly.bg.0.xh&lcsc_vid=T1ELXwUHQlNYVlZRE1JdXlRQFVgNBF1eTlFXBVxWRAAxVlNeQ1lYVlFUQlNXXjsOAxUeFF5JWBYZEEoKFBINSQcJGk4eFQsCAgIaSgADAwAHC0slRFhZUlVVQ08GEwkK, Manufacturer 1 Part Number="HX PZ1.27-2x8P TP", Part Name="CONN,Hdr,2x8 Pin,1.27mm,SMD", Vendor 1=LCSC
J4 J5: library part "CONN,Rcpt,2x8 Pin,1.27mm,SMD", "CONN SOCKET 16POS 1.27mm DUAL ROW SMD", Manufacturer 1=HCTL, Vendor 1 Part Number=C3975134, CreatedBy="Judd Foster", HelpURL=https://www.lcsc.com/datasheet/C3975134.pdf?spm=wm.sxq.inf.ggs___wm.fly.bg.0.xh&lcsc_vid=T1ELXwUHQlNYVlZRE1JdXlRQFVgNBF1eTlFXBVxWRAAxVlNeQ1lYVldfR1VbXjsOAxUeFF5JWBYZEEoKFBINSQcJGk4dAgUUFAk%3D, Manufacturer 1 Part Number=PM127-2-08-S-4.3, Part Name="CONN,Rcpt,2x8 Pin,1.27mm,SMD", Vendor 1=LCSC
L1 L2 L3 L4 L6 L7 L8 L9 L10 L11 L12 L13 L14 L15: library part Ferrite,470R@100MHz,0402, "470 Ohms @ 100 MHz 1 Power Line Ferrite Bead 0402 (1005 Metric) 1A 200mOhm", Manufacturer 1="Murata Electronics", Manufacturer 1 Part Number=BLM15PX471SN1D, Vendor 1 Part Number=490-10662-1-ND, CreatedBy="Judd Foster", HelpURL=https://www.murata.com/en-us/products/productdata/8796740059166/ENFA0018.pdf, Part Name=Ferrite,470R@100MHz,0402, Vendor 1=Digikey
L5: library part IND,10uH,250mA,Multilayer,0603, "10 ï¿½H Shielded Multilayer Inductor 250 mA 1.05Ohm 0603 (1608 Metric)", Manufacturer 1="TDK Corporation", Manufacturer 1 Part Number=MLZ1608M100WT000, Vendor 1 Part Number=445-6389-1-ND, CreatedBy="Judd Foster", HelpURL=https://product.tdk.com/info/en/catalog/datasheets/inductor_commercial_decoupling_mlz1608_en.pdf?ref_disty=digikey, Part Name=IND,10uH,250mA,Multilayer,0603, Vendor 1=Digikey
R1: library part RES,1k,5%,0.063W,0402, "1 kOhms ï¿½5% 0.063W, 1/16W Chip Resistor 0402 (1005 Metric) Automotive AEC-Q200 Thick Film", Manufacturer 1="Stackpole Electronics Inc", Manufacturer 1 Part Number=RMCF0402JT1K00, Vendor 1 Part Number=RMCF0402JT1K00CT-ND, CreatedBy="Judd Foster", HelpURL=https://www.seielect.com/catalog/sei-rmcf_rmcp.pdf, Part Name=RES,1k,5%,0.063W,0402, Vendor 1=DIgikey
R2: library part RES,22k1,1%,0.063W,0402, "RES,22k1,1%,0.063W,0402", Manufacturer 1="Vishay Dale", Manufacturer 1 Part Number=CRCW040222K1FKED, CreatedBy="Kevin Heyer", HelpURL=https://www.vishay.com/docs/20035/dcrcwe3.pdf, Part Name=RES,22k1,1%,0.063W,0402
R3: library part RES,953R,1%,0.063W,0402, "RES,953R,1%,0.063W,0402", Manufacturer 1=YAGEO, Manufacturer 1 Part Number=RC0402FR-07953RL, CreatedBy="Kevin Heyer", HelpURL=https://yageogroup.com/content/datasheet/asset/file/PYU-RT_1-TO-0-01_ROHS_L, Part Name=RES,953R,1%,0.063W,0402
R4: library part RES,10k,5%,0.063W,0402, "10 kOhms ï¿½5% 0.063W, 1/16W Chip Resistor 0402 (1005 Metric) Automotive AEC-Q200 Thick Film", Manufacturer 1="Stackpole Electronics Inc", Manufacturer 1 Part Number=RMCF0402JT10K0, Vendor 1 Part Number=RMCF0402JT10K0CT-ND, CreatedBy="Judd Foster", HelpURL=https://www.seielect.com/catalog/sei-rmcf_rmcp.pdf, Part Name=RES,10k,5%,0.063W,0402, Vendor 1=DIgikey
R5: library part RES,499R,0.1%,0.063W,0402, "RES,499R,0.1%,0.063W,0402", Manufacturer 1=YAGEO, Manufacturer 1 Part Number=RT0402BRD07499RL, CreatedBy="Kevin Heyer", HelpURL=https://yageogroup.com/content/datasheet/asset/file/PYU-RT_1-TO-0-01_ROHS_L, Part Name=RES,499R,0.1%,0.063W,0402
R6_DAC1 R6_DAC2: library part RES,10R,1%,0.063W,0402, "10 Ohms ï¿½1% 0.063W, 1/16W Chip Resistor 0402 (1005 Metric) Automotive AEC-Q200 Thick Film", Manufacturer 1="Panasonic Electronic Components", Manufacturer 1 Part Number=ERJ-2RKF10R0X, Vendor 1 Part Number=P10.0LCT-ND, CreatedBy="Judd Foster", HelpURL=https://industrial.panasonic.com/cdbs/www-data/pdf/RDA0000/AOA0000C304.pdf, Part Name=RES,10R,1%,0.063W,0402, Vendor 1=Digikey
R7 R10 R17: library part RES,0R0,0402, "0 Ohms Jumper 0.1W, 1/10W Chip Resistor 0402 (1005 Metric) Automotive AEC-Q200 Thick Film", Manufacturer 1="Panasonic Electronic Components", Manufacturer 1 Part Number=ERJ-2GE0R00X, Vendor 1 Part Number=P0.0JCT-ND, CreatedBy="Judd Foster", HelpURL=https://industrial.panasonic.com/cdbs/www-data/pdf/RDA0000/AOA0000C301.pdf, Part Name=RES,0R0,0402, Vendor 1=Digikey
R8 R9: library part RES,24R9,1%,0.063W,0402, "RES 24.9 OHM 1% 1/16W 0402", Manufacturer 1="Vishay Dale", Manufacturer 1 Part Number=CRCW040224R9FKED, CreatedBy="Kevin Heyer", HelpURL=https://www.vishay.com/docs/20035/dcrcwe3.pdf, Part Name=RES,24R9,1%,0.063W,0402
R11 R13 R14 R15 R16 R25: library part RES,100k,0.1%,0.063W,0402, "100 kOhms ï¿½0.1% 0.063W, 1/16W Chip Resistor 0402 (1005 Metric) Thin Film", Manufacturer 1=YAGEO, Manufacturer 1 Part Number=RT0402BRE07100KL, Vendor 1 Part Number=YAG2304CT-ND, CreatedBy="Judd Foster", HelpURL=https://www.yageo.com/upload/media/product/app/datasheet/rchip/pyu-rt_1-to-0.01_rohs_l.pdf, Part Name=RES,100k,0.1%,0.063W,0402, Vendor 1=Digikey
R12: library part RES,10k,0.1%,0.063W,0402, "10 kOhms ï¿½0.1% 0.1W, 1/10W Chip Resistor 0402 (1005 Metric) Automotive AEC-Q200 Thin Film", Manufacturer 1="Stackpole Electronics Inc", Manufacturer 1 Part Number=RNCF0402BTE10K0, Vendor 1 Part Number=RNCF0402BTE10K0CT-ND, CreatedBy="Judd Foster", HelpURL=https://www.seielect.com/catalog/sei-rncf.pdf, Part Name=RES,10k,0.1%,0.063W,0402, Vendor 1=Digikey
R18 R19 R21 R22: library part RES,1k,0.1%,0.063W,0402, "1 kOhms Â±0.1% 0.063W, 1/16W Chip Resistor 0402 (1005 Metric) Thin Film", Manufacturer 1=YAGEO, Manufacturer 1 Part Number=RT0402BRE071KL, Vendor 1 Part Number=YAG2306CT-ND, CreatedBy="Judd Foster", HelpURL=https://www.yageo.com/upload/media/product/app/datasheet/rchip/pyu-rt_1-to-0.01_rohs_l.pdf, Part Name=RES,1k,0.1%,0.063W,0402, Vendor 1=DigiKey
R20: library part RES,39R,1%,0.063W,0402, "39 Ohms ï¿½1% 0.063W, 1/16W Chip Resistor 0402 (1005 Metric) Moisture Resistant Thick Film", Manufacturer 1=YAGEO, Manufacturer 1 Part Number=RC0402FR-0739RL, Vendor 1 Part Number=311-39.0LRCT-ND, CreatedBy="Judd Foster", HelpURL=https://www.yageo.com/upload/media/product/productsearch/datasheet/rchip/PYu-RC_Group_51_RoHS_L_12.pdf, Part Name=RES,39R,1%,0.063W,0402, Vendor 1=Digikey
R23: library part 106-00004, "RES,750R,1%,0.063W,0402", Manufacturer1="Panasonic Corporation", Manufacturer1PartNumber=ERJ-2RKF7500X, Changed Date=2026-03-25T20:02:47-07:00, ComponentLink1Description="PLM Part Link", ComponentLink1URL=http://k1plm09.kardium.local/Windchill/app/#ptc1/tcomp/infoPage?ContainerOid=OR:wt.inf.library.WTLibrary:31712871&oid=OR:wt.part.WTPart:123166926&u8=1, CreatedBy="Kevin Riebs (admin)", HelpURL="C:\KVault\Products\Electrical OTS Parts\Datasheets\Panasonic\ERJ-2RKF7500X.pdf", Part Number=106-00004, State=Approved
R24: library part 106-00003, "RES,100R,1%,0.063W,0402", Manufacturer1="Panasonic Corporation", Manufacturer1PartNumber=ERJ-2RKF1000X, Changed Date=2026-03-25T20:11:41-07:00, ComponentLink1Description="PLM Part Link", ComponentLink1URL=http://k1plm09.kardium.local/Windchill/app/#ptc1/tcomp/infoPage?ContainerOid=OR:wt.inf.library.WTLibrary:31712871&oid=OR:wt.part.WTPart:123239745&u8=1, CreatedBy="Kevin Riebs (admin)", HelpURL="C:\KVault\Products\Electrical OTS Parts\Datasheets\Panasonic\ERJ-2RKF1000X.pdf", Part Number=106-00003, State=Approved
U1: "Linear Voltage Regulator IC Positive Fixed 1 Output 150mA SOT-23-5", Manufacturer 1="Texas Instruments", Vendor 1 Part Number=296-40923-1-ND, CreatedBy="Judd Foster", HelpURL=https://www.ti.com/lit/ds/symlink/tps709.pdf?HQS=dis-dk-null-digikeymode-dsf-pf-null-wwe&ts=1736883811582, Manufacturer 1 Part Number=TPS70925DBVR, Part Name=TPS70925DBVR, Vendor 1=DigiKey
U2: library part LM7332MMX_NOPB, "General Purpose Amplifier 2 Circuit Rail-to-Rail 8-VSSOP", Manufacturer 1="Texas Instruments", Vendor 1 Part Number=296-LM7332MMX/NOPBCT-ND, CreatedBy="Judd Foster", HelpURL=https://www.ti.com/lit/ds/symlink/lm7332.pdf?HQS=dis-dk-null-digikeymode-dsf-pf-null-wwe&ts=1730932081789&ref_url=https%253A%252F%252Fwww.ti.com%252Fgeneral%252Fdocs%252Fsuppproductinfo.tsp%253FdistId%253D10%2526gotoUrl%253Dhttps%253A%252F%252Fwww.ti.com%, Manufacturer 1 Part Number=LM7332MMX/NOPB, Part Name=LM7332MMX_NOPB, Vendor 1=DigiKey
U3: "Linear Voltage Regulator IC Negative Fixed 1 Output 200mA SOT-23-5", Manufacturer 1="Texas Instruments", Vendor 1 Part Number=296-39479-1-ND, CreatedBy="Judd Foster", HelpURL=https://www.ti.com/lit/ds/symlink/tps723.pdf?HQS=dis-dk-null-digikeymode-dsf-pf-null-wwe&ts=1736917966718&ref_url=https%253A%252F%252Fwww.ti.com%252Fgeneral%252Fdocs%252Fsuppproductinfo.tsp%253FdistId%253D10%2526gotoUrl%253Dhttps%253A%252F%252Fwww.ti.com%, Manufacturer 1 Part Number=TPS72325DBVR, Part Name=TPS72325DBVR, Vendor 1=DigiKey
U4: "IC VREF SHUNT 36V 0.5% SOT23-3", Manufacturer 1="Texas Instruments", Vendor 1 Part Number=296-18872-1-ND, CreatedBy="Judd Foster", HelpURL=http://www.ti.com/lit/ds/symlink/tl431.pdf, Manufacturer 1 Part Number=TL431BIDBZR, Part Name=TL431BIDBZR, Vendor 1=Digikey
U5: library part BOOST,34V,1.2A,MIC2288YD5-TR, Case/Package=TSOT, Frequency=1.2MHz, Manufacturer=Microchip, Manufacturer Lifecycle Status=REL, Max Junction Temperature (Tj)=125°C, Max Output current=1A, Max Output Voltage=34V, Max Supply Voltage=10V, Min Input Voltage=2.5V, Min Operating Temperature=-40°C, Nominal Supply Current=2.8mA, Category="Voltage Regulators - Switching", ComponentLink1Description=https://datasheet.octopart.com:443/MIC2288YD5-TR-Microchip-datasheet-175858761.pdf?src-supplier=Microchip, ComponentLink1URL=https://datasheet.octopart.com:443/MIC2288YD5-TR-Microchip-datasheet-175858761.pdf?src-supplier=Microchip, ComponentLink2Description=https://datasheet.octopart.com:443/MIC2288YD5-TR-Microchip-datasheet-19250.pdf?src-supplier=Upverter, ComponentLink2URL=https://datasheet.octopart.com:443/MIC2288YD5-TR-Microchip-datasheet-19250.pdf?src-supplier=Upverter, ComponentLink3Description=https://datasheet.octopart.com:443/MIC2288YD5-TR-Microchip-datasheet-137404901.pdf?src-supplier=Upverter, ComponentLink3URL=https://datasheet.octopart.com:443/MIC2288YD5-TR-Microchip-datasheet-137404901.pdf?src-supplier=Upverter, ComponentLink4Description=https://datasheet.octopart.com:443/MIC2288YD5-TR-Microchip-datasheet-141892128.pdf?src-supplier=Augswan, ComponentLink4URL=https://datasheet.octopart.com:443/MIC2288YD5-TR-Microchip-datasheet-141892128.pdf?src-supplier=Augswan, ComponentLink5Description=https://datasheet.octopart.com:443/MIC2288YD5-TR-Microchip-datasheet-142675560.pdf?src-supplier=TME, ComponentLink5URL=https://datasheet.octopart.com:443/MIC2288YD5-TR-Microchip-datasheet-142675560.pdf?src-supplier=TME, ComponentLink6Description=https://datasheet.octopart.com:443/MIC2288YD5-TR-Microchip-datasheet-78862009.pdf?src-supplier=Microchip+SCT, ComponentLink6URL=https://datasheet.octopart.com:443/MIC2288YD5-TR-Microchip-datasheet-78862009.pdf?src-supplier=Microchip+SCT, ComponentLink7Description=http://sigma.octopart.com:80/188455326/materials_sheet/Microchip-MIC2288YD5-TR.pdf?src-supplier=Compliance+Statements, ComponentLink7URL=http://sigma.octopart.com:80/188455326/materials_sheet/Microchip-MIC2288YD5-TR.pdf?src-supplier=Compliance+Statements, ComponentLink8Description=http://sigma.octopart.com:80/rohs_statement/Microchip-company-71.pdf?src-supplier=Compliance+Statements, ComponentLink8URL=http://sigma.octopart.com:80/rohs_statement/Microchip-company-71.pdf?src-supplier=Compliance+Statements, ComponentLink9Description=http://sigma.octopart.com:80/reach_statement/Microchip-company-70.pdf?src-supplier=Compliance+Statements, ComponentLink9URL=http://sigma.octopart.com:80/reach_statement/Microchip-company-70.pdf?src-supplier=Compliance+Statements, ComponentLink10Description=http://sigma.octopart.com:80/conflict_mineral_statement/Microchip-company-69.pdf?src-supplier=Compliance+Statements, ComponentLink10URL=http://sigma.octopart.com:80/conflict_mineral_statement/Microchip-company-69.pdf?src-supplier=Compliance+Statements, ComponentLink11Description=http://sigma.octopart.com:80/conflict_mineral_statement/Microchip-company-68.pdf?src-supplier=Compliance+Statements, ComponentLink11URL=http://sigma.octopart.com:80/conflict_mineral_statement/Microchip-company-68.pdf?src-supplier=Compliance+Statements, Country of Assembly=Malaysia, Country of Fabrication="United States of America", Country of Origin=Malaysia, CreatedBy="Kevin Heyer", Export Control Classification Number (ECCN) Code=EAR99, Harmonized Tariff Schedule (HTS) Code=8542.39.0060, Height=1mm, HelpURL=https://ww1.microchip.com/downloads/en/DeviceDoc/MIC2288-Data-Sheet-DS20006034C.pdf, HS Code=8542.39.0090, Lead Free="Lead Free", Length=2.9mm, Lifecycle Status=Production, Manufacturer 1=Microchip, Manufacturer 1 Part Number=MIC2288YD5-TR, Manufacturer Part Number=MIC2288YD5-TR, Max Duty Cycle=90%, Max Operating Temperature=125°C, Min Supply Voltage=2.5V, Mounting Technology="Surface Mount", Number of Channels=1, Number of Outputs=1, Operating Supply Voltage=10V, Output Configuration=Positive, Output Current=1A, Output Type=Adjustable, Output Voltage=34V, Part Name=BOOST,34V,1.2A,MIC2288YD5-TR, Pins=5, Pricing="1=0.73, 50=0.627, 100=0.618, 250=0.608, 500=0.596, 1000=0.584, 2500=0.572, 5000=0.559 (USD)", Projected EOL Date=2034-01-20, Radiation Hardening=No, REACH SVHC=Unaffected, RoHS=Compliant, Schedule B="8542390000, 8542390000|8542390000|8542390000|8542390000|8542390000", Stock=15737, Supplier=Newark, Supplier Part Number=MIC2288YD5-TR, Switching Frequency=1.2MHz, Synchronous Rectifier=No, Topology=Boost, Width=1.6mm
U6: library part IC,OPAMP,Single,5.5GHz,WSON,OPA858YR, Manufacturer 1="Texas Instruments", CreatedBy="Kevin Heyer", HelpURL=https://www.ti.com/lit/ds/symlink/opa858.pdf?ts=1791673134096, Manufacturer 1 Part Number=OPA858YR, Part Name=IC,OPAMP,Single,5.5GHz,WSON,OPA858YR
U7_DAC1 U7_DAC2: "6us 12 I2C 2.7V~5.5V SOT-23-6 Digital To Analog Converters (DACs) ROHS", Manufacturer 1=Microchip, Vendor 1 Part Number=C144198, CreatedBy="Judd Foster", HelpURL=https://datasheet.lcsc.com/lcsc/1811151442_Microchip-Tech-MCP4725A0T-E-CH_C144198.pdf, Manufacturer 1 Part Number=MCP4725A0T-E/CH, Part Name=MCP4725A0T-E/CH, Vendor 1=LCSC
U8: "Variable Gain Amplifier 1 Circuit Differential 14-HTSSOP", Manufacturer 1="Texas Instruments", Vendor 1 Part Number=296-15181-5-ND, CreatedBy="Judd Foster", HelpURL=https://www.ti.com/lit/ds/symlink/ths7530-q1.pdf?ts=1736214928306&ref_url=https%253A%252F%252Fwww.ti.com%252Famplifier-circuit%252Fpga-vga%252Fproducts.html, Manufacturer 1 Part Number=THS7530PWP, Part Name=THS7530PWP, Vendor 1=DigiKey
U9 U11: "Voltage Feedback Amplifier 1 Circuit Rail-to-Rail SOT-23-6", Manufacturer 1="Texas Instruments", Vendor 1 Part Number=296-44388-1-ND, CreatedBy="Judd Foster", HelpURL=https://www.ti.com/lit/ds/symlink/opa836.pdf?HQS=dis-dk-null-digikeymode-dsf-pf-null-wwe&ts=1741112370606&ref_url=https%253A%252F%252Fwww.ti.com%252Fgeneral%252Fdocs%252Fsuppproductinfo.tsp%253FdistId%253D10%2526gotoUrl%253Dhttps%253A%252F%252Fwww.ti.com%, Manufacturer 1 Part Number=OPA836IDBVR, Part Name=OPA836IDBVR, Vendor 1=DigiKey
U10: "CMOS Amplifier 2 Circuit Rail-to-Rail 8-VSSOP", Manufacturer 1="Texas Instruments", Vendor 1 Part Number=296-22012-1-ND, CreatedBy="Judd Foster", HelpURL=https://www.ti.com/lit/ds/symlink/lmv341.pdf?HQS=dis-dk-null-digikeymode-dsf-pf-null-wwe&ts=1738729278639&ref_url=https%253A%252F%252Fwww.ti.com%252Fgeneral%252Fdocs%252Fsuppproductinfo.tsp%253FdistId%253D10%2526gotoUrl%253Dhttps%253A%252F%252Fwww.ti.com%, Manufacturer 1 Part Number=LMV342IDGKR, Part Name=LMV342IDGKR, Vendor 1=DigiKey
U12: "General Purpose Amplifier 1 Circuit Rail-to-Rail 8-WSON (2x2)", Manufacturer 1="Texas Instruments", Vendor 1 Part Number=296-OPA856IDSGRCT-ND, CreatedBy="Judd Foster", HelpURL=https://www.ti.com/lit/ds/symlink/opa856.pdf?HQS=dis-dk-null-digikeymode-dsf-pf-null-wwe&ts=1736226484393, Manufacturer 1 Part Number=OPA856IDSGR, Part Name=OPA856IDSGR, Vendor 1=DigiKey
U13: library part 106-05785, "IC,Logic,Configurable,SOT23,SN74LVC1G57DBVR", Manufacturer1="Texas Instruments Incorporated", Changed Date=2026-03-19T12:12:39-07:00, ComponentLink1Description="PLM Part Link", ComponentLink1URL=http://k1plm09.kardium.local/Windchill/app/#ptc1/tcomp/infoPage?ContainerOid=OR:wt.inf.library.WTLibrary:31712871&oid=OR:wt.part.WTPart:122961633&u8=1, CreatedBy="Kevin Heyer", HelpURL="C:\KVault\Products\Electrical OTS Parts\Datasheets\Texas Instruments\SN74LVC1G57DBVR.pdf", Manufacturer1PartNumber=SN74LVC1G57DBVR, Part Number=106-05785, State=Approved

## Via types
v1: diameter 0.45, hole 0.3, L1 to L6, tented both sides, 157 vias
v2: diameter 0.45, hole 0.3, L1 to L6, 4 vias

## Nets (pads, with @x,y where several pads share a name; then routed paths per layer and width w, separated by ;. In a path a pad name is that pad's centre, name@x,y a point inside that pad or via, vN(x,y) a via of type N, cw(c..) or ccw(c..) an arc to the next point about the centre after c; other vN are vias at no path point)
+2V5: C2.2 C4.2 C44.2 C45.1 U1.5 U12.7 U12.8 | length 28.8
  L1 w0.5: C4.2@46.9,20.8 47.041,20.659 v1(48.4,20.659)
  L4 w0.5: v1(35.4,5.2) 36.903,6.702 36.903,11.103 38.405,12.605 38.405,14.922 37.1,16.227 v1(37.1,18.1)
  L6 w0.5: v1(37.1,18.1) 37.4,18.4 46.45,18.4 48.4,20.35 v1(48.4,20.659)